# Altium PCB PCB1.PcbDoc
Units mm, origin at the board's own origin, x right, y up, seen from the top; angles counter-clockwise.
Board outline 105 x 145 mm, 2 copper layers (Top Layer, Bottom Layer); 159 components, 110 nets, 512 pads, 120 vias.
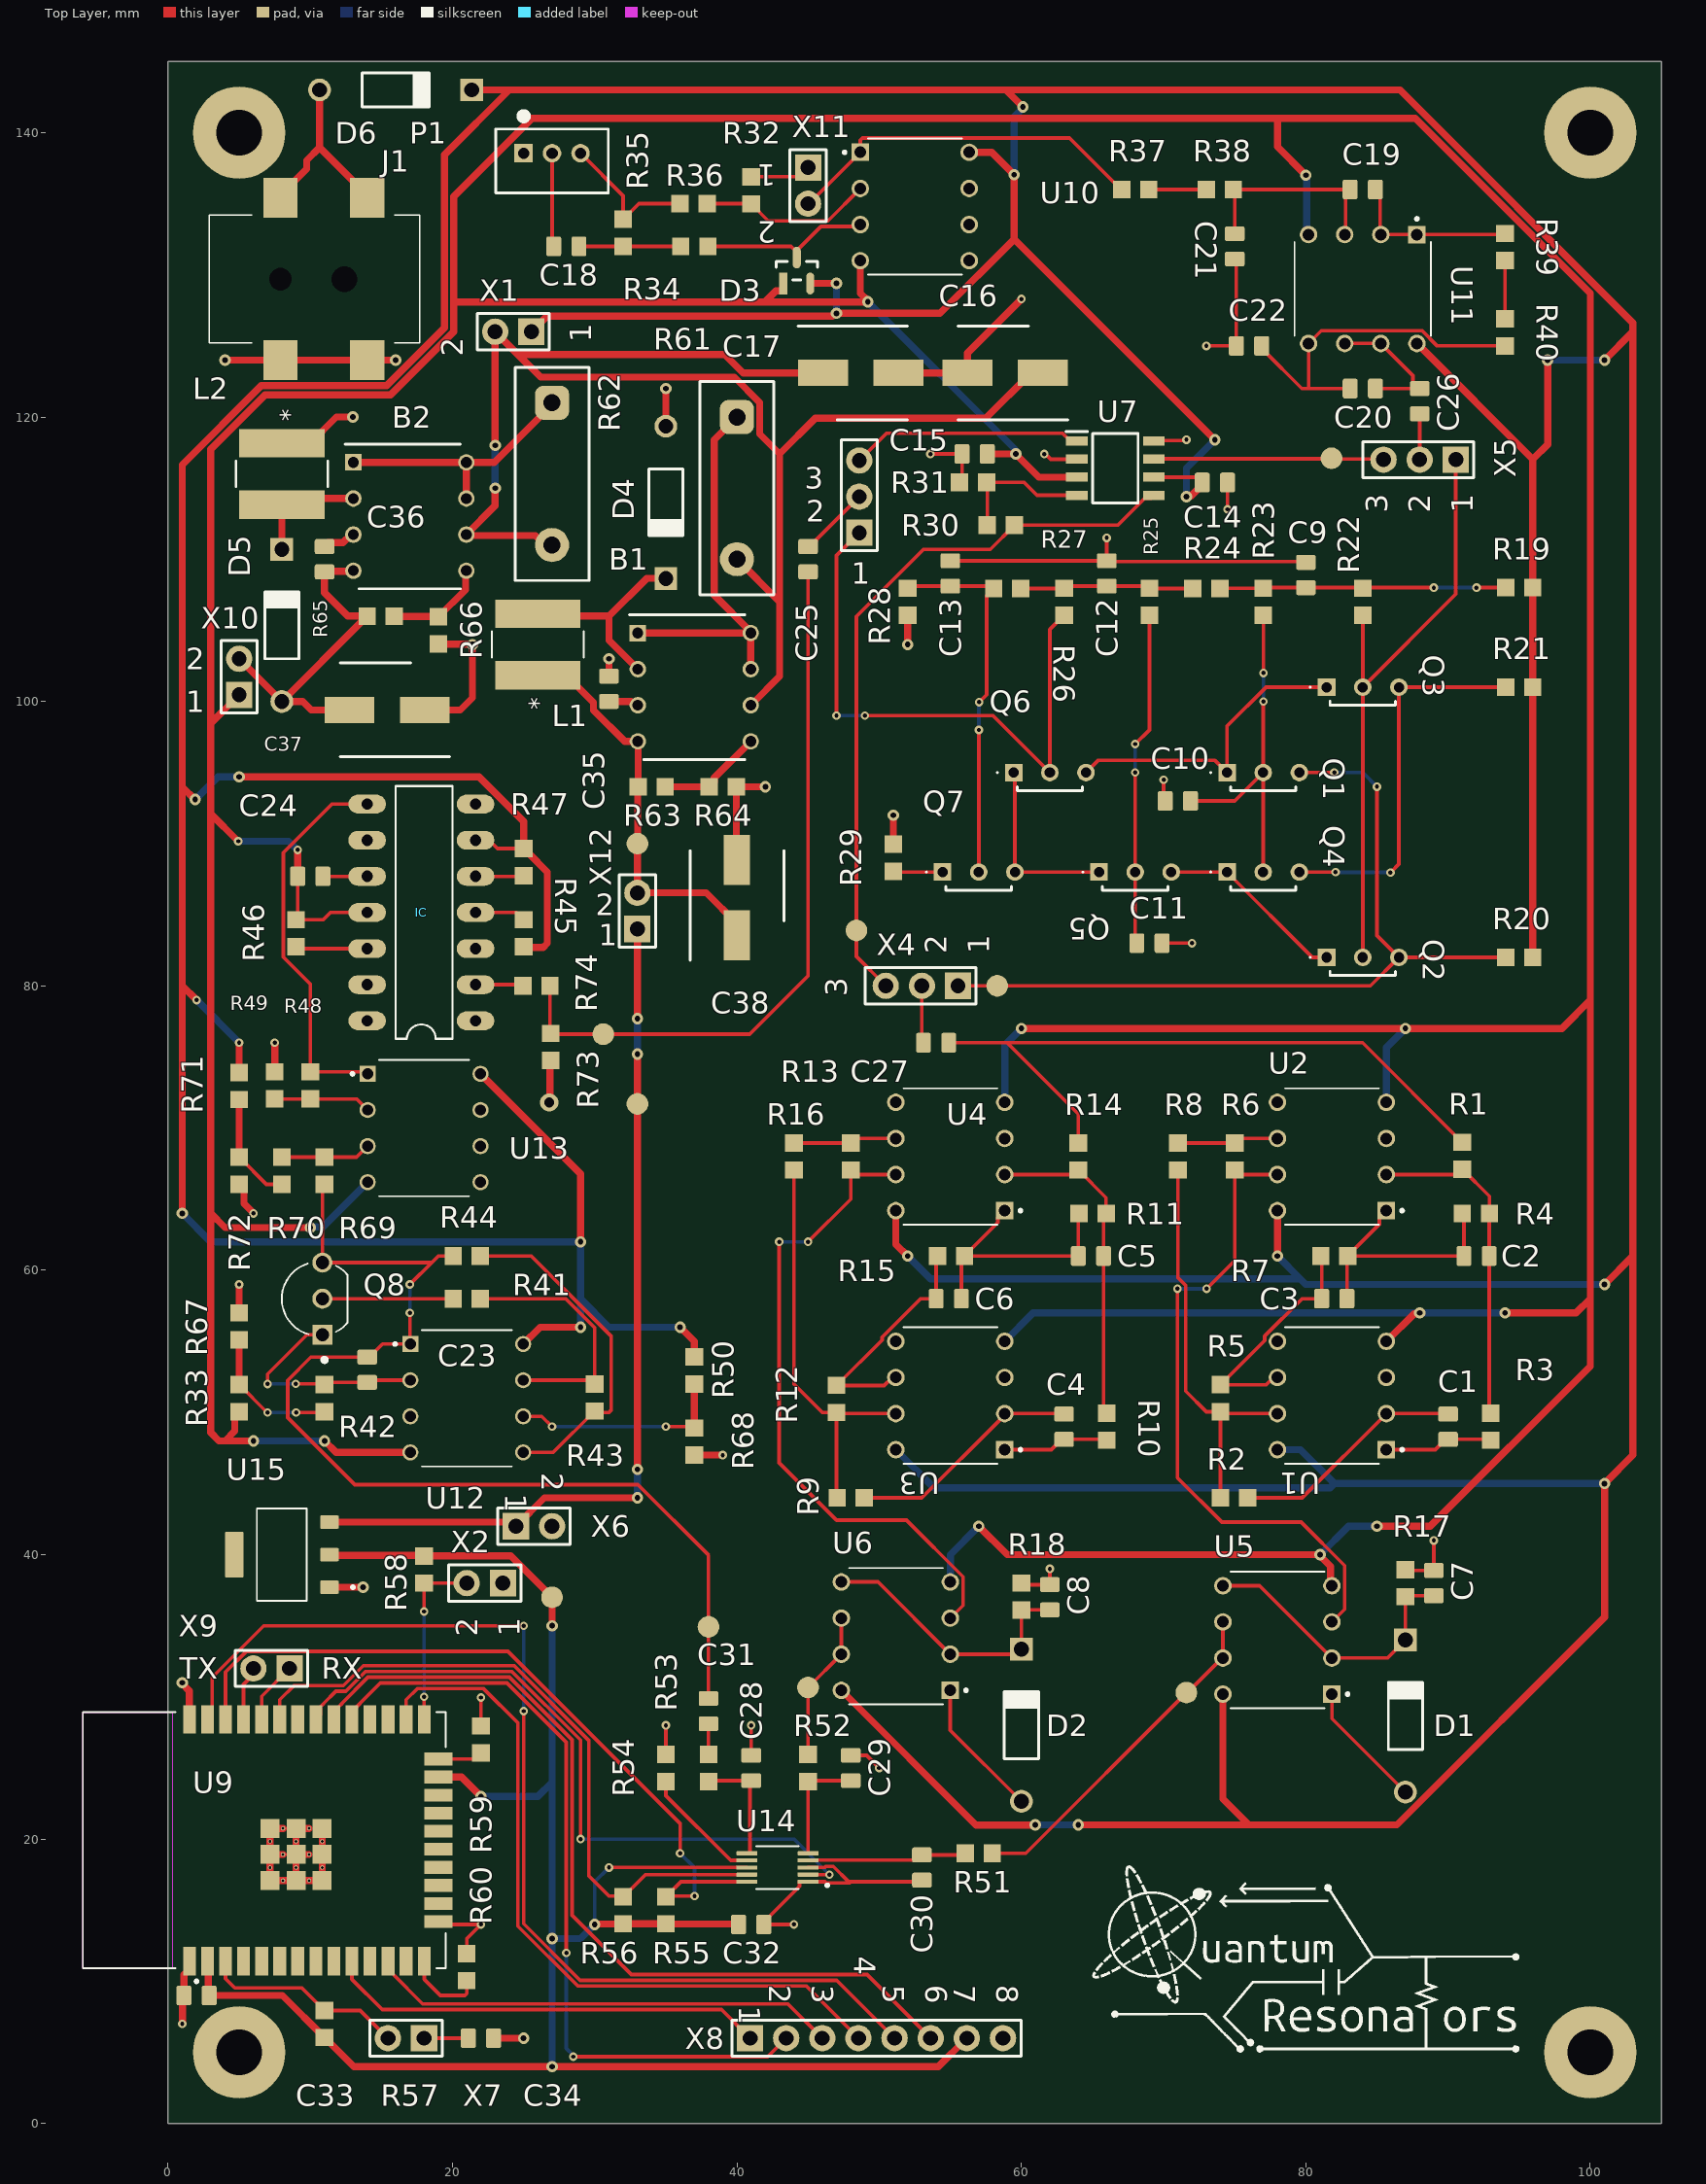
[diagram p0: Top Layer view]
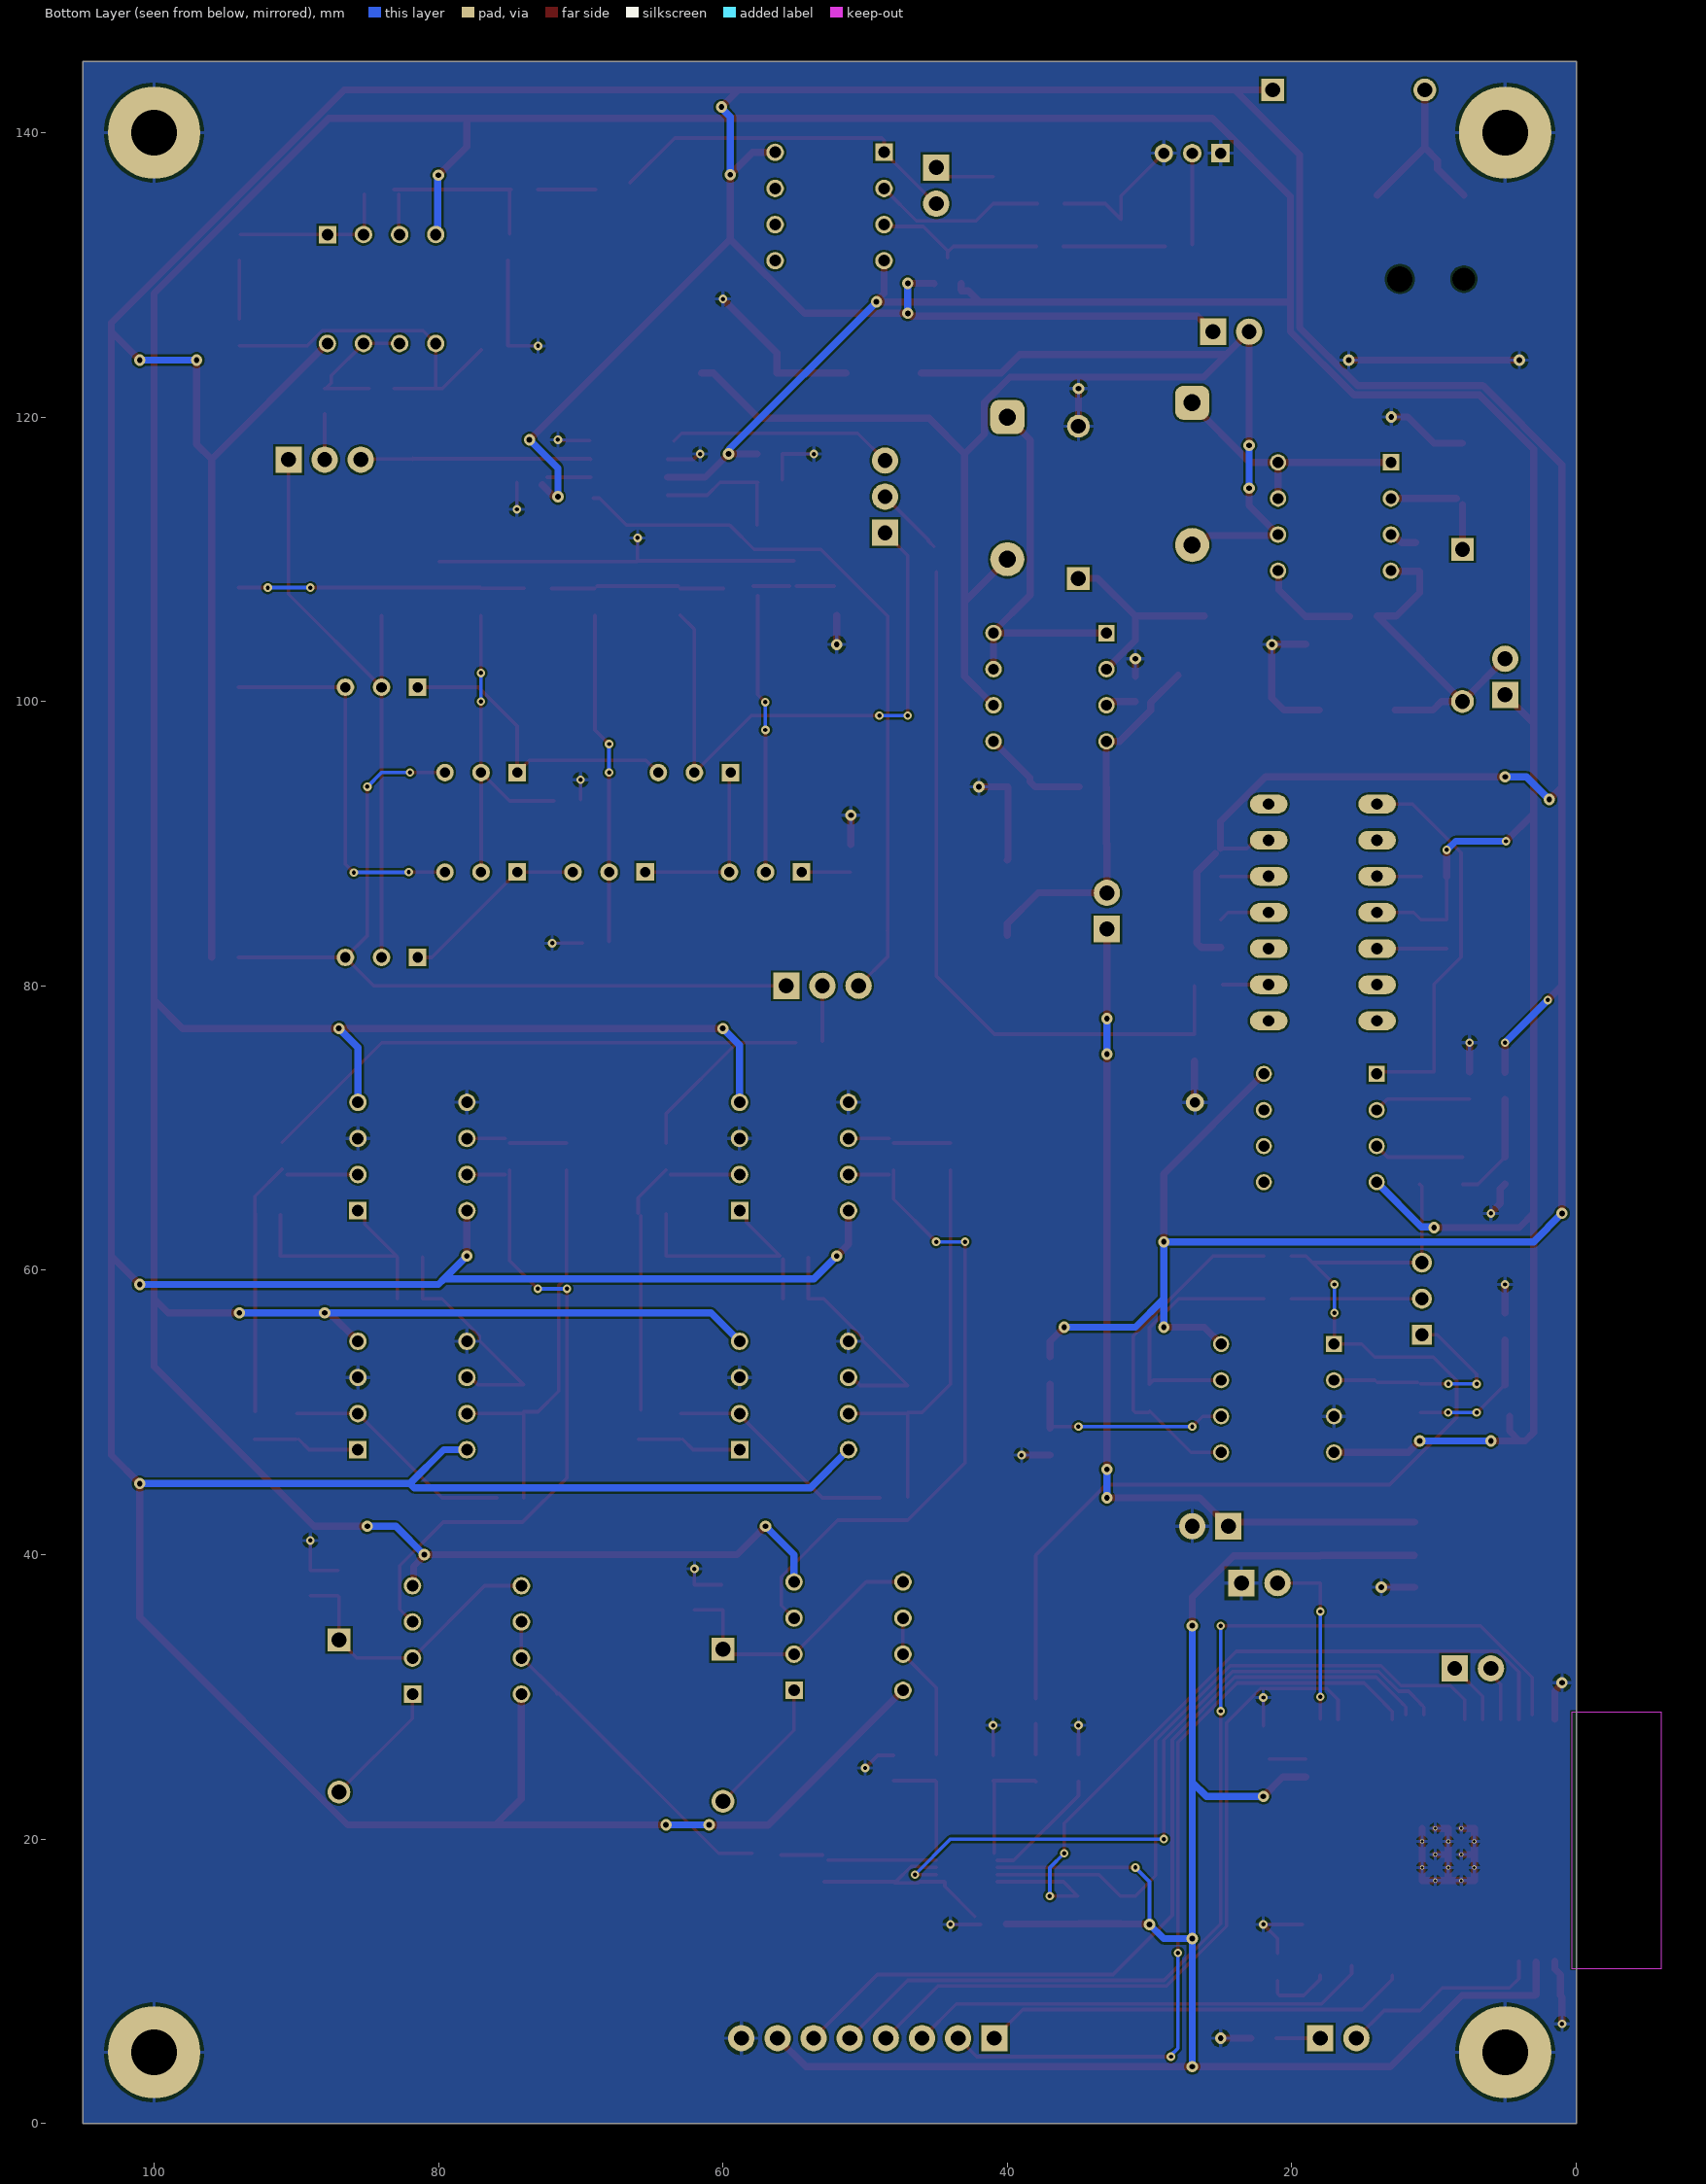
[diagram p1: Bottom Layer view, seen from below]
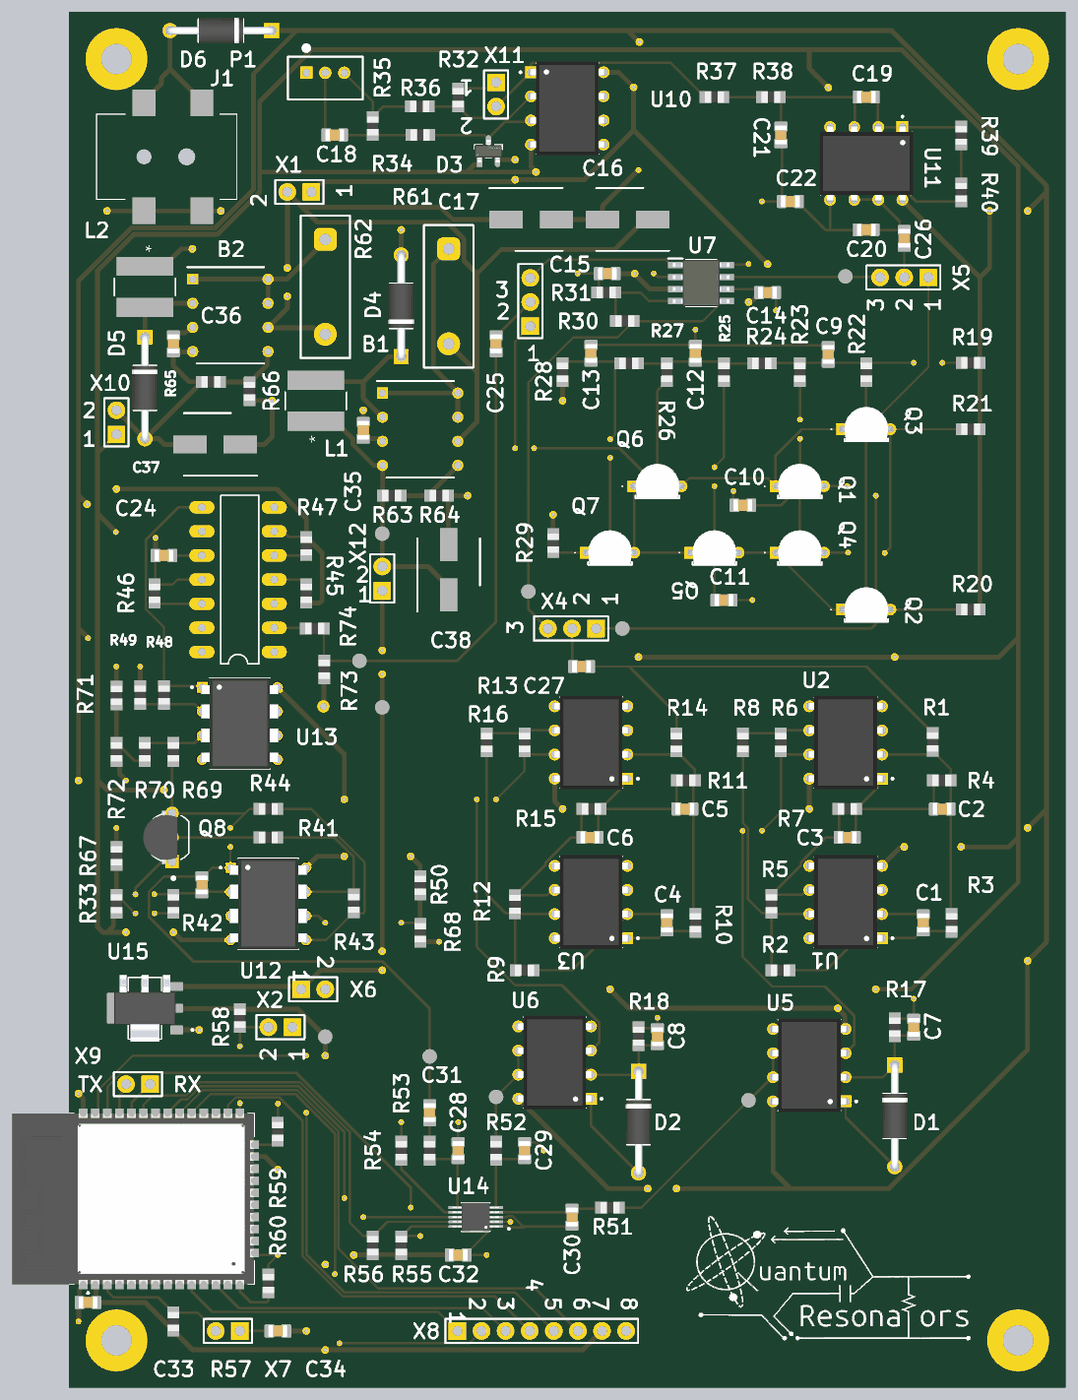
[diagram p2: 3D render of the assembled board from above, using the file's embedded part models]

## Layer stack, top to bottom
Top Solder: solder mask 0.0102, Solder Resist, Dk 3.5
Top Layer: signal copper 0.0356
Dielectric 1: dielectric 0.32, FR-4, Dk 4.8
Bottom Layer: signal copper 0.0356
Bottom Solder: solder mask 0.0102, Solder Resist, Dk 3.5

## Board outline
0,0 0,145 105,145 105,0

## Design rules (kind name [scope] priority, off if disabled: settings)
Clearance [All] p1: gap=0.15 ignorepadtopadclearanceinfootprint=FALSE
HoleSize [All] p1: absolutevalues=TRUE maxlimit=4 minlimit=0.025 maxpercent=80.000 minpercent=20.000
MinimumSolderMaskSliver [All] p1: minsoldermaskwidth=0.1
PolygonConnect [All] p1: connectstyle=Relief reliefconductorwidth=0.254 reliefentries=4 polygonreliefangle="90 Angle" airgapwidth=0.254
RoutingVias [All] p1: holewidth=0.711 width=1.27 viastyle="Through Hole" minholewidth=0.3 minwidth=0.6 maxholewidth=0.711 maxwidth=1.27
SilkToSolderMaskClearance [IsPad] p1: minsilkscreentomaskgap=0.15 clearancetoexposedcopper=TRUE
SolderMaskExpansion [All] p1: expansion=0 istentingtop=FALSE
SupplyNets "Schematic Supply Nets" [InNet('GND')] p1: voltage=0.000
UnRoutedNet [All] p1: checkbadconnections=TRUE
Width [All] p1: maxlimit=0.5 minlimit=0.006 preferedwidth=0.254
26 further rules are at their usual default settings.

## Components (designator, comment, footprint, x,y, rotation, side; value= is the part's Value field where it differs from the comment)
B1 "MC34063AP1G" DIP794W56P254L959H533Q8N 37,101 r0 top
B2 "MC34063AP1G" DIP794W56P254L959H533Q8N 17,113 r0 top
C1 "100nF" CAPC2012X95N 90,49 r90 top
C2 "100nF" CAPC2012X95N 92,61 r180 top
C3 "100nF" CAPC2012X95N 82,58 r180 top
C4 "100nF" CAPC2012X95N 63,49 r90 top
C5 "100nF" CAPC2012X95N 64.888,61 r180 top
C6 "100nF" CAPC2012X95N 54.888,58 r180 top
C7 "100nF" CAPC2012X95N 89,38 r90 top
C8 "100nF" CAPC2012X95N 62,37 r90 top
C9 "100nF" CAPC2012X95N 80,108.888 r90 top
C10 "100nF" CAPC2012X95N 71,93 r0 top
C11 "100nF" CAPC2012X95N 69,83 r180 top
C12 "100nF" CAPC2012X95N 66,109 r90 top
C13 "100nF" CAPC2012X95N 55,109 r90 top
C14 "100nF" CAPC2012X95N 73.6,115.4 r180 top
C15 "100nF" CAPC2012X95N 56.712,117.4 r0 top
C16 "220uF" CAPAE660X800N 58.85,123.1 r180 top
C17 "220uF" CAPAE660X800N 48.7,123.1 r0 top
C18 "1nF" CAPC2012X95N 28,132 r180 top
C19 "1.2nF" CAPC2012X95N 84,136 r0 top
C20 "6.8nF" CAPC2012X95N 84,122 r0 top
C21 "1nF" CAPC2012X95N 75,132 r90 top
C22 "1nF" CAPC2012X95N 76,125 r0 top
C23 "100nF" CAPC2012X95N 14,53 r90 top
C24 "4.7nF" CAPC2012X95N 10,87.7 r180 top
C25 "100nF" CAPC2012X95N 45,110 r270 top
C26 "100nF" CAPC2012X95N 88,121.112 r90 top
C27 "100nF" CAPC2012X95N 54,76 r0 top
C28 "100pF" CAPC2012X95N 41,25 r90 top value=1nF
C29 "100pF" CAPC2012X95N 48,25 r90 top value=1nF
C30 "100pF" CAPC2012X95N 53,18 r270 top value=1nF
C31 "100nF" CAPC2012X95N 38,29 r270 top value=1nF
C32 "100nF" CAPC2012X95N 41,14 r180 top value=1nF
C33 "10nF" CAPC2012X95N 2,9 r180 top locked value=100nF
C34 "1uF" CAPC2012X95N 22,6 r0 top value=100nF
C35 "820pF" CAPC2012X95N 31,100.888 r90 top value=100nF
C36 "820pF" CAPC2012X95N 11,110 r270 top value=100nF
C37 "220uF" CAPAE660X800N 15.4,99.4 r180 top
C38 "220uF" CAPAE660X800N 40,86.2 r90 top
D1 "IN4007" DIOAD1070W78L470D235P 87,28.65 r270 top
D2 "IN4007" DIOAD1070W78L470D235P 60,28 r270 top
D3 "BAV99LT1G" FP-318-08-IPC_B 44.2,130.3 r90 top
D4 "1N5819" DIOAD1070W78L470D235P 35,114 r90 top
D5 "1N5819" DIOAD1070W78L470D235P 8,105.35 r270 top
D6 "IN4007" DIOAD1070W78L470D235P 16,143 r180 top
IC "ICL8038" ICL8038 17.81,85.16 r90 top
J1 "DC-005-5A-2.5-SMT" DC0055A25SMT 10.3,129.7 r0 top
L1 "22uH" IND_BOURNS_SRN6045 26,104 r90 top value=10uH
L2 "88uH" IND_BOURNS_SRN6045 8,116 r270 top value=10uH
P1 "B3B-PH-K-S(LF)(SN)" JST-B3B-PH-K-S-3_V 27,138 r0 top
Q1 "2N2222A" 2N2222A 74.46,95 r0 top
Q2 "2N2222A" 2N2222A 81.46,82 r0 top
Q3 "2N2222A" 2N2222A 81.46,101 r0 top
Q4 "2N2222A" 2N2222A 74.46,88 r0 top
Q5 "2N2222A" 2N2222A 65.46,88 r0 top
Q6 "2N2222A" 2N2222A 59.46,95 r0 top
Q7 "2N2222A" 2N2222A 54.46,88 r0 top
Q8 "2N3904TF" TO92254P520H877-3 10,58 r90 top
R1 "10k" RC0805N_YAG-M 91,68.048 r90 top
R2 "10k" RC0805N_YAG-M 74.953,44 r0 top
R3 "10k" RC0805N_YAG-M 93,49 r90 top
R4 "10k" RC0805N_YAG-M 91.953,64 r0 top
R5 "10k" RC0805N_YAG-M 74,51 r90 top
R6 "10k" RC0805N_YAG-M 75,68 r90 top
R7 "10k" RC0805N_YAG-M 82,61 r0 top
R8 "10k" RC0805N_YAG-M 71,68 r270 top
R9 "10k" RC0805N_YAG-M 48,44 r0 top
R10 "10k" RC0805N_YAG-M 66,49 r90 top
R11 "10k" RC0805N_YAG-M 65,64 r0 top
R12 "10k" RC0805N_YAG-M 47,50.953 r90 top
R13 "10k" RC0805N_YAG-M 48,68 r90 top
R14 "10k" RC0805N_YAG-M 64,68 r90 top
R15 "10k" RC0805N_YAG-M 55.048,61 r0 top
R16 "10k" RC0805N_YAG-M 44,68 r270 top
R17 "10k" RC0805N_YAG-M 87,38 r270 top
R18 "10k" RC0805N_YAG-M 60,37.048 r270 top
R19 "10k" RC0805N_YAG-M 95,108 r0 top
R20 "10k" RC0805N_YAG-M 95,82 r0 top
R21 "10k" RC0805N_YAG-M 95,101 r0 top
R22 "10k" RC0805N_YAG-M 84,107 r270 top
R23 "10k" RC0805N_YAG-M 77,107 r270 top
R24 "10k" RC0805N_YAG-M 73,107.94 r0 top
R25 "10k" RC0805N_YAG-M 69,107 r270 top
R26 "10k" RC0805N_YAG-M 63,107 r270 top
R27 "10k" RC0805N_YAG-M 59,107.94 r0 top
R28 "10k" RC0805N_YAG-M 52,107 r90 top
R29 "10k" RC0805N_YAG-M 51,89 r270 top
R30 "10k" RC0805N_YAG-M 58.553,112.4 r180 top
R31 "10k" RC0805N_YAG-M 56.6,115.4 r180 top
R32 "25k" RC0805N_YAG-M 41,135.94 r270 top
R33 "62k" RC0805N_YAG-M 5,51 r90 top value=10k
R34 "47.5k" RC0805N_YAG-M 37,132 r180 top
R35 "10M" RC0805N_YAG-M 32,132.953 r90 top
R36 "909" RC0805N_YAG-M 36.953,135 r180 top
R37 "29.4k" RC0805N_YAG-M 68,136 r180 top
R38 "29.4k" RC0805N_YAG-M 73.953,136 r180 top
R39 "12.4k" RC0805N_YAG-M 94,131.953 r90 top
R40 "12.4k" RC0805N_YAG-M 94,125.953 r90 top
R41 "10k" RC0805N_YAG-M 21,58 r180 top
R42 "470k" RC0805N_YAG-M 11,51 r270 top
R43 "60k" RC0805N_YAG-M 30,51.048 r270 top
R44 "10k" RC0805N_YAG-M 21,61 r0 top
R45 "10k" RC0805N_YAG-M 25,83.7 r270 top
R46 "82k" RC0805N_YAG-M 9,83.7 r270 top
R47 "10k" RC0805N_YAG-M 25,88.7 r90 top
R48 "22.5k" RC0805N_YAG-M 10,73 r270 top
R49 "10k" RC0805N_YAG-M 7.5,73 r90 top
R50 "62k" RC0805N_YAG-M 37,52.953 r270 top value=10k
R51 "10k" RC0805N_YAG-M 57,19 r0 top
R52 "10k" RC0805N_YAG-M 45,25 r90 top
R53 "10k" RC0805N_YAG-M 38,25 r90 top
R54 "10k" RC0805N_YAG-M 35,25 r90 top
R55 "10k" RC0805N_YAG-M 35,15 r270 top
R56 "10k" RC0805N_YAG-M 32,15 r270 top
R57 "10k" RC0805N_YAG-M 11,7 r90 top
R58 "10k" RC0805N_YAG-M 18,38.953 r270 top
R59 "10k" RC0805N_YAG-M 22,27 r270 top
R60 "10k" RC0805N_YAG-M 21,11 r270 top
R61 "0.33" RES_BPR56_5W_10MM_VERTICAL. 40,115 r270 top value=10k
R62 "0.22" RES_BPR56_5W_10MM_VERTICAL. 27,116 r270 top value=10k
R63 "3.6k" RC0805N_YAG-M 34,94 r180 top value=12.4k
R64 "1.2k" RC0805N_YAG-M 39,94 r180 top value=12.4k
R65 "1k" RC0805N_YAG-M 14.952,106 r180 top value=12.4k
R66 "6.8k" RC0805N_YAG-M 19,105 r90 top value=12.4k
R67 "18k" RC0805N_YAG-M 5,56.048 r90 top value=10k
R68 "18k" RC0805N_YAG-M 37,47.952 r270 top value=10k
R69 "100k" RC0805N_YAG-M 11,67 r270 top
R70 "25k" RC0805N_YAG-M 8,67 r270 top value=10k
R71 "62k" RC0805N_YAG-M 5,72.953 r270 top value=10k
R72 "18k" RC0805N_YAG-M 5,67 r270 top value=10k
R73 "10k" RC0805N_YAG-M 26.9,75.7 r90 top
R74 "10k" RC0805N_YAG-M 25.9,80 r180 top
U1 "NE5532N" DIP766W45P254L1016H533Q8 81.83,51.19 r180 top
U2 "NE5532N" DIP766W45P254L1016H533Q8 81.83,68 r180 top
U3 "NE5532N" DIP766W45P254L1016H533Q8 55,51.19 r180 top
U4 "NE5532N" DIP766W45P254L1016H533Q8 55,68 r180 top
U5 "NE5532N" DIP766W45P254L1016H533Q8 78,34 r180 top
U6 "NE5532N" DIP766W45P254L1016H533Q8 51.17,34.27 r180 top
U7 "AD633JRZ-R7" SOIC127P600X175-8N 66.6,116.4 r0 top
U9 "ESP32-WROOM-32D-N4" MODULE_ESP32-WROOM-32D-N4 6.76,19.918 r90 top
U10 "NE5532N" DIP766W45P254L1016H533Q8 52.5,134.8 r0 top
U11 "NE5532N" DIP766W45P254L1016H533Q8 84,129 r270 top
U12 "TL072CPE4" DIP794W45P254L959H508Q8 21,51 r0 top
U13 "TL072CPE4" DIP794W45P254L959H508Q8 18,70 r0 top
U14 "ADS1115IDGSR" SOP50P490X110-10N 42.85,18 r180 top
U15 "AMS1117-3.3" SOT229P700X180-4N 8,40 r180 top
X1 "Jumper" CON_JUMPER_2POL 25.54,126 r90 top value=10k
X2 "Jumper" CON_JUMPER_2POL 23.54,38 r90 top value=10k
X3 "Jumper" CON_JUMPER_3POL 48.6,111.86 r0 top value=10k
X4 "Jumper" CON_JUMPER_3POL 55.54,80 r90 top value=10k
X5 "Jumper" CON_JUMPER_3POL 90.54,117 r90 top value=10k
X6 "Jumper" CON_JUMPER_2POL 24.46,42 r270 top value=10k
X7 "Jumper" CON_JUMPER_2POL 18,6 r90 top value=10k
X8 "Jumper" CON_JUMPER_8POL_LINEAR 40.92,6 r270 top value=10k
X9 "Jumper" CON_JUMPER_2POL 8.54,32 r90 top value=10k
X10 "Jumper" CON_JUMPER_2POL 5,100.46 r0 top value=10k
X11 "Jumper" CON_JUMPER_2POL 45,137.54 r180 top value=10k
X12 "Jumper" CON_JUMPER_2POL 33,84 r0 top value=10k

## Footprints (in the part's own frame and the unit in brackets; to place one, negate y for a bottom-side part, rotate by r counter-clockwise, add the part's x,y. Pads: shape width x height; smd on the part's side, far side on the other; paste and mask are expansions set on the pad)
2N2222A [mm]
  rect 1.234x1.234 hole 0.72: 1(0,0)
  round 1.234 hole 0.72: 2(2.54,0) 3(5.08,0)
  silkscreen extent -1.2,-1.27 4.84,0.05, body extent -0.2,-1.25 5.28,2.35, height 7.46
CAPAE660X800N [mm]
  rect 3.5x1.85 smd: 1(-2.65,0) 2(2.65,0)
  silkscreen extent -4.4,-3.3 3.3,3.3
CAPC2012X95N [mm]
  rrect25% 1.05x1.38 smd: 1(-0.888,0) 2(0.888,0)
  body extent -1,-0.63 1,0.63, height 0.95
CON_JUMPER_2POL [mm] "Jumper"
  rect 1.85x1.85 hole 1.05: 1(0,0)
  round 1.85 hole 1.05: 2(0,2.54)
  silkscreen extent -1.27,-1.27 1.27,3.81
CON_JUMPER_3POL [mm] "Jumper"
  rect 1.85x1.85 hole 1.05: 1(0,0)
  round 1.85 hole 1.05: 2(0,2.54) 3(0,5.08)
  silkscreen extent -1.27,-1.27 1.27,6.54
CON_JUMPER_8POL_LINEAR [mm] "Jumper"
  rect 1.85x1.85 hole 1.05: 1(0,0)
  round 1.85 hole 1.05: 2(0,2.54) 3(0,5.08) 4(0,7.62) 5(0,10.16) 6(0,12.7) 7(0,15.24) 8(0,17.78)
  silkscreen extent -1.27,-1.27 1.27,19.05
DC0055A25SMT [mm]
  rect 2.4x2.8 smd: 2(-2.4,-5.7) 3(3.7,-5.7) A1(-2.4,5.7) B1(3.7,5.7)
  round 0.8 hole 1.6 unplated: 5(-2.4,0)
  round 0.9 hole 1.8 unplated: 6(2.1,0)
  silkscreen extent -7.4,-4.5 7.4,4.5
DIOAD1070W78L470D235P [mm]
  round 1.6 hole 1.05: A(5.35,0)
  rect 1.6x1.6 / inner round 1.6 / far side rect 1.6x1.6 hole 1.05: C(-5.35,0)
  silkscreen extent -2.4,-1.2 2.35,1.2, body extent -5.74,-1.35 5.74,1.35, height 2.7
DIP766W45P254L1016H533Q8 [mm]
  rect 1.23x1.23 / inner round 1.23 / far side rect 1.23x1.23 hole 0.82: 1(-3.83,3.81)
  round 1.23 hole 0.82: 2(-3.83,1.27) 3(-3.83,-1.27) 4(-3.83,-3.81) 5(3.83,-3.81) 6(3.83,-1.27) 7(3.83,1.27) 8(3.83,3.81)
  silkscreen extent -5.03,-4.79 3.3,4.79, body extent -4,-4.94 4,4.94, height 5.33
DIP794W45P254L959H508Q8 [mm]
  rect 1.13x1.13 / inner round 1.13 / far side rect 1.13x1.13 hole 0.78 mask+0.102: 1(-3.97,3.81)
  round 1.13 hole 0.78 mask+0.102: 2(-3.97,1.27) 3(-3.97,-1.27) 4(-3.97,-3.81) 5(3.97,-3.81) 6(3.97,-1.27) 7(3.97,1.27) 8(3.97,3.81)
  silkscreen extent -5.13,-4.79 3.17,4.79, body extent -4.1,-4.79 4.1,4.79, height 5.08
DIP794W56P254L959H533Q8N [mm]
  rect 1.16x1.16 / inner round 1.16 / far side rect 1.16x1.16 hole 0.76: 1(-3.97,3.81)
  round 1.16 hole 0.76: 2(-3.97,1.27) 3(-3.97,-1.27) 4(-3.97,-3.81) 5(3.97,-3.81) 6(3.97,-1.27) 7(3.97,1.27) 8(3.97,3.81)
  silkscreen extent -4.55,-5.08 3.55,5.08
FP-318-08-IPC_B [mm]
  rect 1.524x0.578 smd paste+0 mask+0: 1(-0.91,0.95)
  rrect100% 1.524x0.578 smd paste+0 mask+0: 2(-0.91,-0.95) 3(0.91,0)
  silkscreen extent -0.65,-1.45 0.65,1.45, body extent -1.92,-1.7 1.92,1.7, height 0.25
ICL8038 [mil]
  oval 52x104 hole 32: 1(-300,-150) 2(-200,-150) 3(-100,-150) 4(0,-150) 5(100,-150) 6(200,-150) 7(300,-150) 8(300,150) 9(200,150) 10(100,150) 11(0,150) 12(-100,150) 13(-200,150) 14(-300,150)
  silkscreen extent -350,-86 350,71
IND_BOURNS_SRN6045 [mil]
  rect 79x236 smd paste+0 mask+0: 1(-85,0) 2(85,0)
  silkscreen extent -36,-127 36,127
JST-B3B-PH-K-S-3_V [mm] "Connector, 3-Leads, Body 7.9x4.5mm, Pitch 2mm"
  rect 1.3x1.3 hole 0.8: 1(-2,0.55)
  round 1.3 hole 0.8: 2(0,0.55) 3(2,0.55)
  silkscreen extent -3.95,-2.25 3.95,3.4, body extent -3.95,-2.25 3.95,2.25, height 6
MODULE_ESP32-WROOM-32D-N4 [mm]
  rect 2x0.9 smd: 1(-8.5,5.26) 2(-8.5,3.99) 3(-8.5,2.72) 4(-8.5,1.45) 5(-8.5,0.18) 6(-8.5,-1.09) 7(-8.5,-2.36) 8(-8.5,-3.63) 9(-8.5,-4.9) 10(-8.5,-6.17) 11(-8.5,-7.44) 12(-8.5,-8.71) 13(-8.5,-9.98) 14(-8.5,-11.25) 25(8.5,-11.25) 26(8.5,-9.98) 27(8.5,-8.71) 28(8.5,-7.44) 29(8.5,-6.17) 30(8.5,-4.9) 31(8.5,-3.63) 32(8.5,-2.36) 33(8.5,-1.09) 34(8.5,0.18) 35(8.5,1.45) 36(8.5,2.72) 37(8.5,3.99) 38(8.5,5.26)
  rect 0.9x2 smd: 15(-5.715,-12.25) 16(-4.445,-12.25) 17(-3.175,-12.25) 18(-1.905,-12.25) 19(-0.635,-12.25) 20(0.635,-12.25) 21(1.905,-12.25) 22(3.175,-12.25) 23(4.445,-12.25) 24(5.715,-12.25)
  rect 1.33x1.33 smd: 39_1(-2.835,-0.405) 39_2(-1,-0.405) 39_3(0.835,-0.405) 39_4(-2.835,-2.24) 39_5(-1,-2.24) 39_6(0.835,-2.24) 39_7(-2.835,-4.075) 39_8(-1,-4.075) 39_9(0.835,-4.075)
  round 0.3 hole 0.2: 39_10(-1.917,-0.405) 39_11(-0.082,-0.405) 39_12(-2.835,-1.323) 39_13(-1,-1.323) 39_14(0.835,-1.323) 39_15(-1.917,-2.24) 39_16(-0.082,-2.24) 39_17(-2.835,-3.158) 39_18(-1,-3.158) 39_19(0.835,-3.158) 39_20(-1.917,-4.075) 39_21(-0.082,-4.075)
  Keep-Out Layer region: 9,6.45 -9,6.45 -9,12.75 9,12.75
  silkscreen extent -10.02,-12.75 9,12.75, body extent -9,-12.75 9,12.75, height 3.25
RC0805N_YAG-M [mil]
  rect 48x49 smd paste+0 mask+0: 1(-37.5,0) 2(37.5,0)
  body extent -39,-24 39,24, height 28
RES_BPR56_5W_10MM_VERTICAL. [mm]
  rrect50% 2.4x2.4 hole 1.2: 1(-5,0)
  round 2.4 hole 1.2: 2(5,0)
  silkscreen extent -7.5,-2.6 7.5,2.6, body extent -7.5,-2.6 7.5,2.6, height 18
SOIC127P600X175-8N [mm]
  rect 1.525x0.65 smd: 1(-2.712,1.905) 2(-2.712,0.635) 3(-2.712,-0.635) 4(-2.712,-1.905) 5(2.712,-1.905) 6(2.712,-0.635) 7(2.712,0.635) 8(2.712,1.905)
  silkscreen extent -3.47,-2.45 1.6,2.58, body extent -3,-2.45 3,2.45, height 1.75
SOP50P490X110-10N [mm]
  rrect25% 1.47x0.28 smd: 1(-2.15,1) 2(-2.15,0.5) 3(-2.15,0) 4(-2.15,-0.5) 5(-2.15,-1) 6(2.15,-1) 7(2.15,-0.5) 8(2.15,0) 9(2.15,0.5) 10(2.15,1)
  silkscreen extent -3.6,-1.5 1.5,1.5, body extent -2.45,-1.5 2.45,1.5, height 1.1
SOT229P700X180-4N [mm]
  rrect15% 1.31x0.93 smd: 1(-3.345,2.29) 2(-3.345,0) 3(-3.345,-2.29)
  rrect15% 1.31x3.24 smd: 4(3.345,0)
  silkscreen extent -5.1,-3.25 1.75,3.25, body extent -3.25,-3.5 3.25,3.5, height 1.8
TO92254P520H877-3 [mm]
  rect 1.41x1.41 / inner round 1.41 / far side rect 1.41x1.41 hole 0.94: 1(-2.54,-0.853)
  round 1.41 hole 0.94: 2(0,-0.853) 3(2.54,-0.853)
  silkscreen extent -4.44,-2.62 2.47,2.01, body extent -2.83,-1.43 2.83,2.19, height 8.77

## Part data
B1 B2: "Low Standby Current; Output Voltage Adjustable; Precision 2% Reference; Operation from 3.0 V to 40 V Input; Current Limiting; Frequency Operation to 100 kHz; Output Switch Current to 1.5 A; MC34063A = 0 to +70; MC33063A = -40 to +85; MC33063AV / NCV33063A = -40 to +125; 4x4mm DFN package option", Manufacturer_Name=onsemi, Mouser Part Number=863-MC34063AP1G, Arrow Part Number=MC34063AP1G, Arrow Price/Stock=https://www.arrow.com/en/products/mc34063ap1g/on-semiconductor?utm_currency=USD&region=europe, Datasheet Link=https://www.onsemi.com/pub/Collateral/MC34063A-D.PDF, Geometry.Height=5.33mm, Manufacturer_Part_Number=MC34063AP1G, Mouser Price/Stock=https://www.mouser.co.uk/ProductDetail/onsemi/MC34063AP1G?qs=dFKnUM%2FquJaLwjzEV8VjCA%3D%3D
C1 C2 C3 C4 C5 C6 C7 C8 C9 C10 C11 C12 C13 C14 C15 C18 C19 C20 C21 C22 C23 C24 C25 C26 C27 C28 C29 C30 C31 C32 C33 C34 C35 C36: library part CAP_0805_GENERIC, "0.1 ÂµF Â±10% 50V Ceramic Capacitor X7R 0805 (2012 Metric)", Package="SMD-2 Samsung", Voltage=50V, Check_prices=https://www.snapeda.com/parts/CL21B104KBCNNNC/Samsung/view-part/?ref=eda, MF="Samsung Electro-Mechanics", MP=CL21B104KBCNNNC, SnapEDA_Link=https://www.snapeda.com/parts/CL21B104KBCNNNC/Samsung/view-part/?ref=snap
C16 C17 C37 C38: library part UUD1C221MCL1GS, "Nichicon 220uF 16 V Aluminium Electrolytic Capacitor, UD Series 2000h 6.3 Dia. x 7.7mm", Manufacturer_Name=Nichicon, Mouser Part Number=647-UUD1C221MCL, Arrow Part Number=UUD1C221MCL1GS, Arrow Price/Stock=https://www.arrow.com/en/products/uud1c221mcl1gs/nichicon?utm_currency=USD&region=nac, Datasheet Link=http://www.mouser.com/datasheet/2/293/e-uud-1513238.pdf, Geometry.Height=8mm, Manufacturer_Part_Number=UUD1C221MCL1GS, Mouser Price/Stock=https://www.mouser.co.uk/ProductDetail/Nichicon/UUD1C221MCL1GS?qs=BJlw7L4Cy78LNN5S2Zav%252BA%3D%3D
D1 D2 D6: "Diode Standard 1000 V 1A Through Hole DO-204AL (DO-41)", Package="DO-41 Vishay Semiconductor", Check_prices=https://www.snapeda.com/parts/IN4007/Vishay/view-part/?ref=eda, MF="Vishay Semiconductor", MP=IN4007, SnapEDA_Link=https://www.snapeda.com/parts/IN4007/Vishay/view-part/?ref=snap
D3: library part CMP-07163-000036-1, "DIODE ARRAY 100V 215MA SOT23-3", Capacitance=1.5pF, Case/Package=SOT-23, Current Rating=200mA, Forward Current=150mA, Forward Voltage=1.25V, Max Forward Surge Current (Ifsm)=500mA, Max Operating Temperature=150°C, Max Repetitive Reverse Voltage (Vrrm)=70V, Min Operating Temperature=-65°C, Peak Non-Repetitive Surge Current=2A, Peak Reverse Current=2.5uA, Height=0.94mm, Lead Free="Lead Free", Length=2.9mm, Mount="Surface Mount", Number of Pins=3, Packaging="Tape and Reel", REACH SVHC="No SVHC", Reverse Recovery Time=6ns, Voltage Rating (DC)=70V, Width=1.3mm
D4 D5: library part IN4007, "Diode Standard 1000 V 1A Through Hole DO-204AL (DO-41)", Package="DO-41 Vishay Semiconductor", Check_prices=https://www.snapeda.com/parts/IN4007/Vishay/view-part/?ref=eda, MF="Vishay Semiconductor", MP=IN4007, SnapEDA_Link=https://www.snapeda.com/parts/IN4007/Vishay/view-part/?ref=snap
IC: "IC OSCILL GEN/VOLT CONTROL 14DIP", Package=None, Availability=Unavailable, MF="Renesas Electronics", MP=ICL8038, Price=None, SnapEDA_Link=https://www.snapeda.com/parts/ICL8038/Renesas%20Electronics%20America%20Inc./view-part/1764984/?ref=snap
J1: "DC Power Jack", Manufacturer_Name="XKB Connectivity", Datasheet Link=https://datasheet.lcsc.com/szlcsc/XKB-DC-005-5A-2-5-SMT_C319133.pdf, Geometry.Height=11mm, Manufacturer_Part_Number=DC-005-5A-2.5-SMT
L1 L2: library part IND_SRN6045_GENERIC, "Description", Current=3A, Manufacturer_Name="Bourns Electronics", Manufacturer_Part_Number=SRN6045-100M, Copyright="Copyright (C) 2026 Ultra Librarian. All rights reserved."
P1: library part CMP-2000-05164-1, "Male Header, Pitch 2 mm, 1 x 3 Position, Height 6 mm, Tail Length 3.4 mm, -25 to 85 degC, RoHS, Bulk", Manufacturer=JST, Datasheet URL=https://datasheet.ciiva.com/11746/0900766b80826550-11746939.pdf, Datasheet Version=Oct-06, Manufacturer URL=http://www.jst.com/home2.html, No of Positions=3, Pitch=2mm, Style/Orientation=StraightHeader/Plug, Termination=Crimp, Type=ShroudedHeader
Q1 Q2 Q3 Q4 Q5 Q6 Q7: "Transistor BJT NPN", Manufacturer_Name=Diotec, Mouser Part Number=637-2N2222A, Arrow Part Number=2N2222A, Arrow Price/Stock=https://www.arrow.com/en/products/2n2222a/diotec-semiconductor-ag, Datasheet Link=https://diotec.com/request/datasheet/2n2222a.pdf, Height=7.5mm, Manufacturer_Part_Number=2N2222A, Mouser Price/Stock=https://www.mouser.co.uk/ProductDetail/Diotec-Semiconductor/2N2222A?qs=OlC7AqGiEDmNlRSTGL2dYg%3D%3D
Q8: "Transistor General Purpose BJT NPN 40 Volt 0.2 Amp 3-Pin TO-92 Tape And Reel", Package="TO-92-3 ON Semiconductor", Check_prices=https://www.snapeda.com/parts/2N3904TF/Fairchild+Imaging/view-part/?ref=eda, MF="Fairchild Semiconductor", MP=2N3904TF, SnapEDA_Link=https://www.snapeda.com/parts/2N3904TF/Fairchild+Imaging/view-part/?ref=snap
R1 R2 R3 R4 R5 R6 R7 R8 R9 R10 R11 R12 R13 R14 R15 R16 R17 R18 R19 R20 R21 R22 R23 R24 R25 R26 R27 R28 R29 R30 R31 R32 R33 R34 R35 R36 R37 R38 R39 R40 R41 R42 R43 R44 R45 R46 R47 R48 R49 R50 R51 R52 R53 R54 R55 R56 R57 R58 R59 R60 R63 R64 R65 R66 R67 R68 R69 R70 R71 R72 R73 R74: library part RES_0805_GENERIC_1, "Description", Manufacturer_Name=Yageo, Manufacturer_Part_Number=RC0805FR-0710KL, Copyright="Copyright (C) 2025 Ultra Librarian. All rights reserved."
R61 R62: library part RES_BPR56_5W_10MM_VERTICAL, "Description", Manufacturer_Name=Yageo, Manufacturer_Part_Number=RC0805FR-0710KL, Copyright="Copyright (C) 2025 Ultra Librarian. All rights reserved."
U1 U2 U3 U4 U5 U6 U10 U11: "IC, OP AMP, DUAL; No. of Amplifiers: 2 Amplifier; Bandwidth: 10MHz; Slew Rate: 8V/Âµs; Supply Voltage Range: Â± 15V; Amplifier Case Style: DIP; No. of Pins: 8Pins; Operating Temperature Min: 0Â°C; Operating Temperature Max: 70Â°C; MSL: -; SVHC: No SVHC (1", Package="PDIP-8 ON Semiconductor", Check_prices=https://www.snapeda.com/parts/NE5532N/Fairchild+Imaging/view-part/?ref=eda, MF="Fairchild Semiconductor", MP=NE5532N, SnapEDA_Link=https://www.snapeda.com/parts/NE5532N/Fairchild+Imaging/view-part/?ref=snap
U7: "Analog Multiplier 4-Quadrant 8-SOIC", Package="SOIC-8 Analog Devices", Check_prices=https://www.snapeda.com/parts/AD633AR/Analog+Devices/view-part/?ref=eda, MF="Analog Devices", MP=AD633AR, SnapEDA_Link=https://www.snapeda.com/parts/AD633AR/Analog+Devices/view-part/?ref=snap
U9: "Bluetooth, WiFi 802.11b/g/n, Bluetooth v4.2 +EDR, Class 1, 2 and 3 Transceiver Module 2.4GHz ~ 2.5GHz Integrated, Trace Surface Mount", Package="Non Standard Espressif Systems", Check_prices=https://www.snapeda.com/parts/ESP32-WROOM-32D-N4/Espressif+Systems/view-part/?ref=eda, MF="Espressif Systems", MP=ESP32-WROOM-32D-N4, SnapEDA_Link=https://www.snapeda.com/parts/ESP32-WROOM-32D-N4/Espressif+Systems/view-part/?ref=snap
U12 U13: "Dual Low-Noise JFET-Input General-Purpose Operational Amplifier 8-PDIP 0 to 70", Package="PDIP-8 Texas", Check_prices=https://www.snapeda.com/parts/TL072CPE4/Texas+Instruments/view-part/?ref=eda, MF="Texas Instruments", MP=TL072CPE4, SnapEDA_Link=https://www.snapeda.com/parts/TL072CPE4/Texas+Instruments/view-part/?ref=snap
U14: "16-bit, 860-SPS, 4-channel, delta-sigma ADC with PGA, oscillator, VREF, comparator and I2C", Package="VSSOP-10 Texas Instruments", Check_prices=https://www.snapeda.com/parts/ADS1115IDGSR/Texas+Instruments/view-part/?ref=eda, MF="Texas Instruments", MP=ADS1115IDGSR, SnapEDA_Link=https://www.snapeda.com/parts/ADS1115IDGSR/Texas+Instruments/view-part/?ref=snap
U15: "LDO Voltage Regulators 800MA LDO LINEAR REG", Package="SOT-223 Seeed Technology", Check_prices=https://www.snapeda.com/parts/AMS1117-3.3/ams/view-part/?ref=eda, MF="ams AG", MP=AMS1117-3.3, SnapEDA_Link=https://www.snapeda.com/parts/AMS1117-3.3/ams/view-part/?ref=snap
X1 X2 X6 X7 X9 X10 X11 X12: library part CON_JUMPER_2POL, Manufacturer_Name=Yageo, Manufacturer_Part_Number=RC0805FR-0710KL, Copyright="Copyright (C) 2025 Ultra Librarian. All rights reserved."
X3 X4 X5: library part CON_JUMPER_3POL, Manufacturer_Name=Yageo, Manufacturer_Part_Number=RC0805FR-0710KL, Copyright="Copyright (C) 2025 Ultra Librarian. All rights reserved."
X8: library part CON_JUMPER_8POL_LINEAR, Manufacturer_Name=Yageo, Manufacturer_Part_Number=RC0805FR-0710KL, Copyright="Copyright (C) 2025 Ultra Librarian. All rights reserved."

## Free pads (board coordinates)
  round 6.5 hole 3.2: 2(5,5) 2(100,5) 3(5,140) 3(100,140)
  round 1.524 smd: 4(27,37) 4(30.6,76.6) 4(33,71.7) 4(33,90) 4(38,34.923) 4(45,30.66) 4(48.4,83.9) 4(58.3,80) 4(71.6,30.3) 4(81.8,117.1)

## Via types
v1: diameter 0.6, hole 0.3, Top Layer to Bottom Layer, 63 vias
v2: diameter 0.8, hole 0.4, Top Layer to Bottom Layer, 56 vias
v3: diameter 1.27, hole 0.711, Top Layer to Bottom Layer, 1 vias

## Nets (pads, with @x,y where several pads share a name; then routed paths per layer and width w, separated by ;. In a path a pad name is that pad's centre, name@x,y a point inside that pad or via, vN(x,y) a via of type N, cw(c..) or ccw(c..) an arc to the next point about the centre after c; other vN are vias at no path point)
GND: C7.2 C8.2 C9.2 C10.1 C11.1 C12.2 C13.2 C14.1 C15.1 C16.2 C17.2 C21.1 C22.1 C28.2 C29.2 C30.2 C32.1 C33.2 C34.2 C35.2 C37.1 C38.2 D4.A J1.2 J1.3 L2.1 P1.1 P1.3 pad.2 pad.3 R17.1 R18.1 R28.1 R29.1 R31.2 R35.2 R36.2 R49.2 R54.2 R59.1 R60.1 R64.1 R66.1 R67.2 R68.2 R72.2 R73.1 U1.3 U1.5 U2.3 U2.5 U3.3 U3.5 U4.3 U4.5 U7.2 U7.8 U9.1 U9.15 U9.38 U9.39_1 U9.39_2 U9.39_3 U9.39_4 U9.39_5 U9.39_6 U9.39_7 U9.39_8 U9.39_9 U9.39_10 U9.39_11 U9.39_12 U9.39_13 U9.39_14 U9.39_15 U9.39_16 U9.39_17 U9.39_18 U9.39_19 U9.39_20 U9.39_21 U12.3 U14.1 U14.3 U15.1 X2.1 X6.2 X8.8 | length 192.8
  Top Layer w0.254: U9.15@19.264,14 v1(22,14) ; R60.1 21,13 21.934,13.934 v1@21.934,13.974 ; R59.1 v1(22,29.953) ; P1.3 32,135.55 R35.2 ; R35.2@32.013,133.905 33.108,135 R36.2 ; R54.2 v1(35,28) ; C28.2 v1(41,28) ; C32.1 v1(44,14) ; C32.1@42.285,14.562 44.392,16.669 44.392,16.987 44.405,17 46.184,17 46.261,16.923 47.923,16.923 48,17 ; U14.3 46.15,18 46.227,18.077 46.769,18.077 47.846,17 48,17 ; C29.2 49.112,25.888 v1(50,25) ; C30.2@52.888,17 48,17 ; v1(53.6,117.4) C15.1 R31.2@55.824,115.577 ; C13.2 C12.2 v1(66,111.5) ; R18.1@60.112,37.888 C8.2 v1(62,39) ; v1@61.694,117.4 62.059,117.035 U7.2 ; C12.2@66.056,109.832 C9.2@79.944,109.832 ; U7.8@69.359,118.353 v1@71.553,118.353 ; C11.1 v1(72,83) ; C10.1@70,93.112 v1(70,94.492) ; v1(73,125) C22.1 C21.1@75.112,131 ; v1(74.488,113.512) C14.1 ; R17.1@87.065,38.888 C7.2 ; C7.2 v1(89,41)
  Top Layer w0.5: v1@1,7.027 1.019,7.046 1.019,8.869 C33.2@1,8.888 ; v2@1,30.919 1.5,30.419 U9.38 ; C33.2 1.112,10.48 1.5,10.868 U9.1 ; v2(4,124) J1.2 13,124 v2(16,124) ; R67.2 v1(5,59) ; R72.2 5.339,65.708 5.339,64.688 v1@6,64.027 ; R49.2 v1(7.5,76) ; L2.1 9.994,118.159 11.835,120 v2(13,120) ; U9.39_13 U9.39_2 ; U9.39_14 U9.39_3 U9.39_2 ; U9.39_18 U9.39_5 ; U9.39_19 U9.39_6 U9.39_5 ; U9.39_9 U9.39_7 U9.39_4 ; U15.1 v2(13.71,37.71) ; C37.1 20.55,99.4 21.4,100.25 v2(21.4,104) 21.376,104.024 19.024,104.024 R66.1 ; C34.2 v2(25,6) ; v3@26.85,71.85 R73.1@26.85,74.698 ; C35.2 v2(31,103) ; D4.A v2(35,122) ; R68.2 v1(39,47) ; C38.2 39.953,88.897 R64.1 v2(42,94) ; R29.1 v2(51,92) ; C17.2 C16.2 56.2,124.5 v1(60,128.3) ; v2(52,104) R28.1 ; U9.39_2 U9.39_1 U9.39_4 ; U9.39_4 U9.39_5
  other v1: 1,7 6,64 61.6,117.4 71.6,118.4
  other v2: 1,31
  other v3: 26.8,71.8
NetB1_1: B1.1 B1.7 B1.8 R61.1 | length 27.3
  Top Layer w0.5: B1.1 B1.8 B1.7 ; R61.1 38.4,118.4 38.4,107.469 B1.8@40.97,104.899
NetB1_2: B1.2 D4.C L1.2 | length 14.5
  Top Layer w0.5: L1.2@26.159,106 31,106 ; B1.2 31,104.3 31,106 ; D4.C 33.65,108.65 31,106
NetB1_3: B1.3 C35.1 | length 2
  Top Layer w0.5: C35.1 32.581,100 B1.3@32.851,99.73
NetB1_4: B1.4 C38.1 L1.1 pad.4@33,90 R63.2 X12.2 | length 26.6
  Top Layer w0.5: L1.1@27.994,101.841 29.91,99.925 29.91,99.386 32.106,97.19 B1.4 ; X12.2 37.835,86.54 40,84.375 C38.1 ; X12.2@33.024,86.564 33,86.588 33,89.976 33.024,90 R63.2@33.024,93.976 ; R63.2 B1.4@33.048,97.173
NetB1_5: B1.5 R63.1 R64.2 | length 7.3
  Top Layer w0.5: R63.1 R64.2 38.407,94.36 38.407,94.627 B1.5@40.844,97.064
NetB1_6: B1.6 B2.6 C16.1 C17.1 R61.2 R62.2 X1.2 | length 111.8
  Top Layer w0.5: v2(23,115) 23,113.76 B2.6 21.033,111.667 25.819,111.667 26.486,111 R62.2 ; v2(23,118) X1.2 24.6,124.4 ; R61.2 43,107 ; B1.6@41.049,99.809 43,101.76 43,107 ; C17.1 40.433,123.1 39.133,124.4 24.6,124.4 ; C16.1 60.675,123.1 57.487,119.912 45.512,119.912 43,117.4 ; 24.6,124.4 26.2,122.8 39.814,122.8 41.6,121.014 41.6,118.8 43,117.4 ; 43,107 43,117.4
  Bottom Layer w0.5: v2(23,115) v2(23,118)
NetB2_1: B2.1 B2.7 B2.8 R62.1 | length 18.2
  Top Layer w0.5: B2.1 B2.8 ; B2.7 B2.8 ; R62.1@27,120.869 22.941,116.81 B2.8
NetB2_2: B2.2 D5.C L2.2 | length 7.7
  Top Layer w0.5: D5.C L2.2 ; L2.2@8.429,114.27 B2.2
NetB2_3: B2.3 C36.1 | length 1.8
  Top Layer w0.5: C36.1@11.275,111.163 12.284,111.163 B2.3@12.851,111.73
NetB2_4: B2.4 C36.2 C37.2 D5.A R65.2 X10.2 | length 24.8
  Top Layer w0.5: X10.2 D5.A ; C36.2 11,107.64 12.64,106 R65.2 14,105.987 13.64,105.628 13.628,105.628 D5.A ; C36.2@11.039,109.151 B2.4@12.991,109.151 ; C37.2 10.074,99.4 9.474,100 D5.A
NetB2_5: B2.5 R65.1 R66.2 | length 7
  Top Layer w0.5: R65.1@15.929,105.976 R66.2@18.976,105.976 ; R66.2@19.013,105.953 20.92,107.86 B2.5@20.92,109.14
NetC1_1: C1.1 R3.1 U1.1 | length 7.4
  Top Layer w0.254: U1.1 89.101,47.38 C1.1@89.833,48.112 ; C1.1 R3.1@92.936,48.112
NetC1_2: C1.2 R2.2 U1.2 | length 16.5
  Top Layer w0.254: R2.2 79.74,44 U1.2 C1.2@89.968,49.92
NetC2_1: C2.1 R1.1 R3.2 R4.2 U2.2 | length 22.8
  Top Layer w0.254: U2.2 R1.1@90.635,66.73 ; R1.1@91.013,67.095 92.905,65.203 R4.2 ; R3.2@92.888,50.065 R4.2@92.888,63.983
NetC2_2: C2.2 C3.1 R4.1 R7.2 U2.1 | length 18.3
  Top Layer w0.254: C3.1 R7.2@82.888,60.936 ; R7.2 C2.2 R4.1@91.112,63.888 ; R7.2@82.953,61.013 85.172,63.232 85.172,63.702 U2.1
NetC3_2: C3.2 R5.2 R7.1 U1.6 | length 17
  Top Layer w0.254: U1.6 77.736,52.46 77.228,51.953 R5.2 74.013,51.953 77.108,55.048 77.108,55.369 79.739,58 C3.2 R7.1@81.112,60.936
NetC4_1: C4.1 R10.1 U3.1 | length 7.2
  Top Layer w0.254: U3.1 62.101,47.38 C4.1@62.833,48.112 ; C4.1 R10.1@65.935,48.112
NetC4_2: C4.2 R9.2 U3.2 | length 15.9
  Top Layer w0.254: R9.2 53,44 U3.2@58.475,49.475 ; U3.2 C4.2@62.968,49.92
NetC5_1: C5.1 R10.2 R11.2 R14.1 U4.2 | length 22.4
  Top Layer w0.254: U4.2 R14.1@63.683,66.73 ; R14.1@64.013,67.048 65.953,65.108 R11.2 ; R10.2@65.776,50.176 R11.2@65.776,63.823
NetC5_2: C5.2 C6.1 R11.1 R15.2 U4.1 | length 18.1
  Top Layer w0.254: C6.1 R15.2@55.776,60.776 ; R15.2 C5.2 R11.1@64,63.953 ; R15.2@56,61.013 58.342,63.355 58.342,63.702 U4.1
NetC6_2: C6.2 R12.2 R15.1 U3.6 | length 16.9
  Top Layer w0.254: R12.2 47.013,51.905 50.202,55.094 50.202,55.293 52.909,58 C6.2 R15.1@54,60.905 ; R12.2@47.006,51.899 50.345,51.899 50.906,52.46 U3.6
NetC7_1: C7.1 D1.C R17.2 U5.2 U5.5 | length 20.4
  Top Layer w0.254: U5.5 76.75,37.81 U5.2 85.73,32.73 D1.C R17.2 ; R17.2@87.065,37.112 C7.1
NetC8_1: C8.1 D2.C R18.2 U6.2 U6.5 | length 19.6
  Top Layer w0.254: U6.5 49.92,38.08 U6.2 59.65,33 D2.C R18.2 ; R18.2@60.017,36.112 C8.1
NetC9_1: C9.1 R19.1 R22.1 R23.1 R24.2 | length 19.9
  Top Layer w0.254: R24.2@73.965,107.952 R23.1 ; R23.1@77.048,108 R22.1@83.953,108 ; R22.1@84.048,108 v1(89,108) ; v1(92,108) R19.1
  Bottom Layer w0.254: v1(89,108) v1(92,108)
NetC10_2: C10.2 Q1.2 Q4.2 R23.2 | length 23.9
  Top Layer w0.254: C10.2 75,93 Q1.2 Q4.2 ; Q1.2@77.008,95.008 v1@77.008,99.992 ; v1@77.016,102.016 R23.2@77.016,106.032
  Bottom Layer w0.254: v1@77.016,100.016 v1@77.016,101.984
  other v1: 77.016,100 77.016,102
NetC11_2: C11.2 Q5.2 R25.2 | length 23.3
  Top Layer w0.254: C11.2@68,83.112 Q5.2 v1(68,95) ; v1(68,97) 69,98 R25.2
  Bottom Layer w0.254: v1(68,95) v1(68,97)
NetC12_1: C12.1 R24.1 R25.1 R26.1 R27.2 | length 11.8
  Top Layer w0.254: R27.2 R26.1@62.987,107.94 ; R26.1@63.16,108.112 R25.1@68.841,108.112 ; R25.1@69.013,107.94 R24.1
NetC13_1: C13.1 Q7.2 R27.1 R28.2 | length 24.9
  Top Layer w0.254: R28.2@52.16,108.112 C13.1@54.841,108.112 ; C13.1@55.319,108.112 R27.1@57.875,108.112 ; Q7.2@57.004,88.012 v1@57.004,97.988 ; v1@57.075,100 57.549,100.474 R27.1@57.549,107.444
  Bottom Layer w0.254: v1@57.017,98.001 v1@57.017,99.999
  other v1: 57.008,97.992 57.025,99.95
NetC14_2: C14.2 D3.2 D6.C IC.6 R19.2 R20.2 R21.2 R45.2 R47.2 R50.1 R71.1 U1.8 U2.8 U3.8 U4.8 U5.8 U6.8 U7.6 U10.8 U11.8 U12.8 U13.8 X1.1 | length 723.4
  Top Layer w0.254: IC.6 22.569,90.24 23.157,89.653 R47.2 ; U7.6 C14.2@72.347,115.765
  Top Layer w0.5: v2(1,64) 1,80 ; v2(1.9,93.1) 1,94 ; v1(2,79) 1,80 ; R71.1 v1(5,76) ; v2(5,94.7) 21.86,94.7 25.013,91.547 R47.2@25.013,89.653 ; D6.C 24,143 ; U13.8 29,66.78 v2(29,62) ; U12.8 26.16,56 v2(29,56) ; R45.2@25,82.7 26.372,82.7 26.665,82.993 26.665,88 R47.2@25.372,89.293 ; X1.1 26.64,127.1 46.729,127.1 46.919,127.29 54.273,127.29 59.483,132.5 v2(59.483,137.033) 57.906,138.61 U10.8 ; v2(36,56) 37,55 R50.1 ; D3.2 45.155,129.395 46.995,129.395 v2(47,129.4) ; U6.8 56.807,20.993 v2(60.972,20.993) ; U4.8 51.17,61.83 v2(52,61) ; 59.5,132.5 v2(73.6,118.4) ; v2(60.1,141.8) 59,142.9 59,143 ; v2(64,21) 76,21 ; v2@71.657,114.457 71.934,114.457 C14.2@72.712,115.235 ; U5.8 74.17,22.83 76,21 ; v2(78,61) U2.8 ; U11.8 95.953,117.027 ; R20.2 95.953,117.027 ; v2(97,124) 97,118.075 95.953,117.027 ; v2(101,59) 103,61 ; v2(101,124) 103,126 ; 1,80 1,94 ; 1,94 1,116.644 6.556,122.2 15.366,122.2 19.44,126.274 19.44,138.44 24,143 ; 24,143 59,143 ; 59,143 86.622,143 103,126.622 103,126 ; 76,21 86.397,21 101,35.603 v2(101,45) 103,47 103,61 ; 103,61 103,126
  Bottom Layer w0.5: v2(1,64) 3,62 v2(29,62) 29,58 ; v2(1.9,93.1) 3.5,94.7 v2(5,94.7) ; v1(2,79) v1(5,76) ; v2(29,56) 29,58 ; v2(36,56) 31,56 29,58 ; v2(47,127.29) v2(47,129.4) ; U3.8 53.843,44.707 81.707,44.707 82,45 ; v2(52,61) 53.6,59.4 79.6,59.4 ; v2(59.483,137.033) 59.483,141.102 60.1,141.719 v2(60.1,141.8) ; v2@61.003,20.997 v2@63.997,20.997 ; v2(71.6,114.4) 71.6,116.4 v2(73.6,118.4) ; U1.8 79.62,47.38 82,45 ; v2(78,61) 79.6,59.4 ; v2(97,124) v2(101,124) ; v2(101,45) 82,45 ; v2(101,59) 80,59 79.6,59.4
NetC15_2: C15.2 C24.2 D3.1 IC.11 R33.1 R46.1 U1.4 U2.4 U3.4 U4.4 U5.4 U6.4 U7.3 U10.4 U11.4 U12.4 U13.4 X10.1 | length 530.5
  Top Layer w0.254: R46.1@9.112,84.653 10.917,84.653 11.425,85.16 IC.11 ; R46.1@9.112,84.765 C24.2
  Top Layer w0.5: R33.1@4.688,49.735 4.688,48.688 4,48 ; v1(4.933,90.167) 3,92.1 ; X10.1 3,98.46 ; v2(6,48) 4,48 ; C24.2 v1(9.112,89.561) ; v2(10,63) 4,63 3,64 ; v2@11.006,48 11.816,47.19 U12.4 ; D3.1 43.25,128.917 43.211,128.878 42.738,128.878 41.95,128.09 ; U10.4 48.67,128.706 49.2,128.176 v2(49.2,128.095) 49.195,128.09 41.95,128.09 ; v2(57,42) 59,40 v2(81,40) ; C15.2 v2(59.6,117.4) 61.235,115.765 U7.3 ; v2(60,77) 98,77 100,79 ; v2(80,137) 78,139 78,141 ; v2@81,39.919 81.744,39.175 U5.4@81.744,37.896 ; v2(85,42) 88.75,42 100,53.25 100,58 ; U1.4 87.603,56.943 v2@87.943,56.943 ; v2(94,57) 99,57 100,58 ; 3,64 3,48.586 3.586,48 4,48 ; 3,64 3,92.1 ; 3,92.1 3,98.46 ; 3,98.46 3,117.725 6.825,121.55 15.635,121.55 20.09,126.005 20.09,128.09 ; 20.09,128.09 41.95,128.09 ; 20.09,128.09 20.09,135.505 25.584,141 60.431,141 78,141 ; 78,141 87.703,141 100,128.703 100,79 ; 100,58 100,79
  Bottom Layer w0.5: v1(4.933,90.167) 8.479,90.167 9.085,89.561 v1(9.112,89.561) ; v2(6,48) v2(11,48) ; v2@10.057,63.057 10.897,63.057 U13.4 ; v2(49.2,128.095) 59.543,117.752 v2@59.543,117.457 ; U6.4 55,40 v2(57,42) ; U3.4 60.83,57 v2(94,57) ; U4.4 58.83,75.83 v2(60,77) ; v2@80.057,136.943 80.057,132.963 U11.4 ; v2(81,40) 83,42 v2(85,42) ; U2.4 85.66,75.66 v2(87,77)
  other v2: 88,57
NetC18_1: C18.1 R34.2 R35.1 | length 7.2
  Top Layer w0.254: C18.1 R34.2
NetC18_2: C18.2 P1.2 | length 6.4
  Top Layer w0.254: C18.2@27,132.112 P1.2
NetC19_1: C19.1 C21.2 R38.1 U11.3 | length 14
  Top Layer w0.254: R38.1 C19.1 ; C21.2 R38.1@75,135.905 ; U11.3@82.788,132.888 C19.1@82.788,135.676
NetC19_2: C19.2 R39.2 U11.1 U11.2 | length 11.4
  Top Layer w0.254: U11.2@85.212,132.888 C19.2@85.212,135.676 ; U11.2 R39.2@93.925,132.83
NetC20_1: C20.1 C22.2 R40.1 U11.5 | length 25
  Top Layer w0.254: C22.2@77,124.723 79.723,122 C20.1 ; 80.19,122.078 U11.5 81.082,126.062 88.179,126.062 89.241,125 R40.1
NetC20_2: C20.2 C26.2 U11.6 U11.7 | length 9.9
  Top Layer w0.254: U11.6 U11.7 87.534,122.906 87.534,122.398 C26.2@87.932,122 ; C20.2 C26.2
NetC23_1: C23.1 Q8.1 R42.1 U12.2 | length 15.3
  Top Layer w0.254: v1(7,52) 7,52.694 9.767,55.46 Q8.1 ; v1@9.018,52.018 R42.1@10.935,52.018 ; R42.1@11.16,52.112 C23.1 ; C23.1@14.158,52.27 U12.2
  Bottom Layer w0.254: v1@7.009,52.009 v1@8.991,52.009
  other v1: 8.985,52.018
NetC23_2: C23.2 C31.1 pad.4@38,34.923 Q8.3 R44.1 R69.2 U12.1 | length 77.3
  Top Layer w0.254: R69.2 10.853,65.9 Q8.3 18.54,60.54 ; U12.1@17,54.84 v1(17,57) ; v1(17,59) 18.54,60.54 ; U12.1 15.087,54.81 14.165,53.888 10.039,53.888 8.408,52.257 8.408,49.635 13.125,44.918 33.04,44.918 38,39.957 C31.1 ; R44.1 19,61 18.54,60.54
  Bottom Layer w0.254: v1(17,57) v1(17,59)
NetC24_1: C24.1 IC.10 | length 3.1
  Top Layer w0.254: C24.1 IC.10
NetC25_1: C25.1 X3.2 | length 4.9
  Top Layer w0.254: C25.1@45.163,110.888 45.56,111.286 45.56,111.36 X3.2
NetC25_2: C25.2 pad.4@30.6,76.6 R73.2 R74.1 | length 51.6
  Top Layer w0.254: R73.2@26.852,76.6 30.6,76.6 40.9,76.6 45,80.7 C25.2 ; R73.2@26.852,76.7 R74.1
NetC26_1: C26.1 X5.2 | length 3.2
  Top Layer w0.254: X5.2 C26.1
NetC27_1: C27.1 X4.2 | length 3.9
  Top Layer w0.254: C27.1@53,76.112 X4.2
NetC27_2: C27.2 R1.2 R14.2 | length 48.1
  Top Layer w0.254: C27.2 59,76 ; R14.2 64,71 59,76 ; R1.2@90.987,69 83.987,76 59,76
NetC28_1: C28.1 R53.1 U14.6 | length 8.2
  Top Layer w0.254: R53.1 38.065,24.112 C28.1 40.921,24.033 U14.6@40.921,19.013
NetC29_1: C29.1 R52.1 U14.5 | length 8
  Top Layer w0.254: U14.5 R52.1 ; R52.1@45.065,24.112 C29.1
NetC30_1: C30.1 R51.1 U14.4 | length 10.5
  Top Layer w0.254: U14.4@45.013,18.513 C30.1@52.599,18.513 ; C30.1 R51.1@55.935,18.888
NetC31_2: C31.2 R53.2 | length 2.2
  Top Layer w0.254: R53.2 C31.2
NetC32_2: C32.2 C33.1 pad.4@27,37 R55.2 R56.2 R57.1 R58.1 U9.2 U9.23 U14.8 U15.2 X8.7 | length 144.7
  Top Layer w0.254: v1(31,18) U14.8
  Top Layer w0.5: C33.1@2.829,9.059 U9.2@2.829,11.359 ; C33.1 8.035,9 R57.1@10.987,6.048 ; R57.1@11.013,6.048 13.06,4 54.16,4 X8.7 ; U15.2@11.392,39.953 R58.1@17.952,39.953 ; R58.1 24.095,39.905 27,37 v2(27,35) ; U9.23 20.637,24.363 v2(22,23) ; v2@30.024,14.024 R56.2@32.024,14.024 ; R56.2@32.047,14.047 R55.2@34.976,14.047 ; R55.2@35,14.024 C32.2@40.088,14.024
  Bottom Layer w0.254: v2(30,14) 30,17 v1(31,18)
  Bottom Layer w0.5: v2(22,23) 26,23 27,24 ; v2(27,4) v2(27,13) ; v2(27,35) 27,24 ; v2(30,14) 29,13 v2(27,13) ; v2(27,13) 27,24
NetC34_1: C34.1 X7.1 | length 3.1
  Top Layer w0.254: X7.1 C34.1
NetD1_A: D1.A U5.1 | length 9
  Top Layer w0.254: U5.1 81.83,28.47 D1.A
NetD2_A: D2.A U6.1 | length 9.9
  Top Layer w0.254: U6.1 55,27.65 D2.A
NetD3_3: D3.3 R34.1 U10.3 | length 12.1
  Top Layer w0.254: R34.1 43.796,132 44.106,131.689 44.2,131.689 D3.3 ; D3.3@44.2,131.683 45.911,133.394 48.534,133.394 U10.3
NetD6_A: D6.A J1.A1 J1.B1 | length 13.3
  Top Layer w0.5: J1.A1@7.9,135.6 9.75,137.45 9.75,138.05 10.65,138.95 ; D6.A 10.65,138.95 ; J1.B1@14,135.6 10.65,138.95
NetIC_2: IC.2 R74.2 | length 3.2
  Top Layer w0.254: IC.2 R74.2@24.868,80.08
NetIC_4: IC.4 R45.1 | length 3.6
  Top Layer w0.254: IC.4 24.48,85.16 R45.1@24.987,84.652
NetIC_5: IC.5 R47.1 | length 3.4
  Top Layer w0.254: IC.5 R47.1@25,87.7
NetIC_8: IC.8 R48.1 U13.1 | length 27.6
  Top Layer w0.254: IC.8 11.515,92.78 8.101,89.366 8.101,82.023 10,80.124 R48.1 13.888,73.952 U13.1
NetIC_12: IC.12 R46.2 | length 4.9
  Top Layer w0.254: R46.2@9.128,82.62 IC.12
NetQ1_1: Q1.1 Q3.1 Q6.3 | length 22
  Top Layer w0.254: Q6.3 65.389,95.849 73.611,95.849 Q1.1 74.46,98.26 77.2,101 Q3.1
NetQ1_3: pad.4@58.3,80 Q1.3 Q2.3 R20.1 X4.1 | length 57.8
  Top Layer w0.254: X4.1 58.3,80 84.54,80 Q2.3 ; Q1.3 v1(82,95) ; v1(85,94) 85,83.54 Q2.3 ; R20.1 Q2.3
  Bottom Layer w0.254: v1(82,95) 84,95 v1(85,94)
NetQ2_1: Q2.1 Q4.1 Q5.3 | length 13.4
  Top Layer w0.254: Q5.3 Q4.1 80.46,82 Q2.1
NetQ2_2: Q2.2 Q3.2 R22.2 X5.1 | length 42.8
  Top Layer w0.254: Q2.2 Q3.2 ; R22.2 Q3.2 ; X5.1 90.54,107.54 Q3.2
NetQ3_3: Q3.3 Q4.3 R21.1 | length 27.1
  Top Layer w0.254: Q4.3 v1@81.999,88.001 ; v1@86,88.015 86.54,88.555 Q3.3 R21.1
  Bottom Layer w0.254: v1@82.018,87.982 v1@85.982,87.982
  other v1: 85.947,87.963 82.085,88.001
NetQ5_1: Q5.1 Q6.1 Q7.3 | length 12.8
  Top Layer w0.254: Q6.1@59.54,94.92 Q7.3 Q5.1
NetQ6_2: Q6.2 R26.2 X3.1 | length 41.7
  Top Layer w0.254: v1(47,99) 47,110.26 X3.1 ; v1(49,99) 58,99 Q6.2 62,105.06 R26.2@63,106.06
  Bottom Layer w0.254: v1(47,99) v1(49,99)
NetQ7_1: Q7.1 R29.2 | length 3.4
  Top Layer w0.254: R29.2@51.048,88 Q7.1
NetQ8_2: Q8.2 R41.2 | length 9.2
  Top Layer w0.254: Q8.2 R41.2
NetR2_1: R2.1 R5.1 R8.2 U1.7 | length 28.8
  Top Layer w0.254: R8.2 71,59.484 71.545,58.939 71.545,51.499 72.997,50.048 R5.1 R2.1 ; R5.1@74.128,49.92 U1.7
NetR6_1: R6.1 U2.7 U5.3 | length 45.8
  Top Layer w0.254: v1(70.968,58.7) 70.968,45.408 74.088,42.289 79.669,42.289 82.722,39.235 82.722,36.162 U5.3 ; v1(73.018,58.7) 75,60.682 R6.1 ; R6.1@75.318,66.73 U2.7
  Bottom Layer w0.254: v1(70.968,58.7) v1(73.018,58.7)
NetR6_2: R6.2 R8.1 U2.6 | length 6.7
  Top Layer w0.254: R8.1 R6.2 ; R6.2@75.318,69.27 U2.6
NetR9_1: R9.1 R12.1 R16.2 U3.7 | length 28.8
  Top Layer w0.254: R16.2 44,51.997 45.997,50 R12.1 ; R9.1@47,44.048 R12.1@47,49.92 ; R12.1@47.08,49.92 U3.7
NetR13_1: R13.1 U4.7 U6.3 | length 46.2
  Top Layer w0.254: v1(42.968,62) 42.968,46.456 47.004,42.42 51.922,42.42 55.892,38.449 55.892,36.432 U6.3 ; v1(45,62) 48,65 R13.1 ; R13.1@48.318,66.73 U4.7
  Bottom Layer w0.254: v1(42.968,62) v1(45,62)
NetR13_2: R13.2 R16.1 U4.6 | length 6.9
  Top Layer w0.254: R16.1 R13.2 ; R13.2@48.318,69.27 U4.6
NetR30_1: pad.4@48.4,83.9 R30.1 U7.5 X4.3 | length 51
  Top Layer w0.254: X4.3 48.4,82.06 48.4,83.877 48.423,83.9 48.4,83.923 48.4,105.976 53.114,110.69 57.808,110.69 59.505,112.387 R30.1 66.78,112.4 68.677,114.297 U7.5@69.114,114.297
NetR30_2: R30.2 R31.1 U7.4 | length 9.7
  Top Layer w0.254: R31.1 60.191,115.4 61.096,114.495 U7.4 ; R30.2 R31.1@57.6,115.353
NetR32_1: R32.1 X11.1 | length 4.3
  Top Layer w0.254: R32.1 44.352,136.892 X11.1
NetR32_2: R32.2 R36.1 U10.2 | length 12.2
  Top Layer w0.254: R36.1 R32.2@40.987,135 ; R32.2@41.013,134.987 42.202,133.798 46.398,133.798 U10.2
NetR33_2: R33.2 R42.2 R67.1 | length 9.9
  Top Layer w0.254: R33.2@5.013,51.952 v1@6.965,50 ; v1(9,50) R42.2@10.953,50
  Top Layer w0.5: R33.2 R67.1
  Bottom Layer w0.254: v1(7,50) v1(9,50)
NetR37_1: R37.1 R38.2 | length 4
  Top Layer w0.254: R37.1 R38.2
NetR37_2: R37.2 U10.1 X11.2 | length 25.2
  Top Layer w0.254: X11.2 45.06,135 U10.1 48.67,139.47 48.819,139.619 63.381,139.619 R37.2@66.528,136.472
NetR39_1: R39.1 R40.2 | length 4.1
  Top Layer w0.254: R40.2 R39.1
NetR41_1: R41.1 R43.1 U12.7 | length 18
  Top Layer w0.254: R41.1 27.957,58 30,55.957 R43.1 29.73,52.27 U12.7
NetR43_2: R43.2 R44.2 U12.5 | length 24.2
  Top Layer w0.254: R44.2 25.529,61 31.149,55.38 31.149,50.149 31,50 30.082,50 29.987,50.095 27.082,47.19 U12.5
NetR48_2: R48.2 R49.1 U13.2 | length 6.9
  Top Layer w0.254: R49.1 13.253,72.047 U13.2
NetR50_2: R50.2 R68.1 U12.6 | length 15.5
  Top Layer w0.254: U12.6 26.27,49.73 v1(27,49) ; v1(35,49) 36.905,49 R68.1
  Top Layer w0.5: R68.1 R50.2
  Bottom Layer w0.254: v1(27,49) v1(35,49)
NetR51_2: pad.4@71.6,30.3 R51.2 U5.6 U5.7 | length 24.5
  Top Layer w0.254: R51.2 60.3,19 71.53,30.23 71.67,30.23 71.67,30.3 74.1,32.73 U5.7 U5.6
NetR52_2: pad.4@45,30.66 R52.2 U6.6 U6.7 | length 10.6
  Top Layer w0.254: R52.2 45,30.66 U6.7 U6.6
NetR54_1: R54.1 U14.7 | length 8.6
  Top Layer w0.254: R54.1 35,23.057 39.557,18.5 U14.7
NetR55_1: R55.1 U9.36 U14.10 | length 54.4
  Top Layer w0.254: U9.36 4.04,31.74 5.502,33.202 23.899,33.202 36,21.101 v1(36,19) ; v1(37.016,16) 35.06,16 36.06,17 U14.10
  Bottom Layer w0.254: v1(36,19) 37.016,17.984 v1(37.016,16)
NetR56_1: R56.1 U9.33 U14.9 | length 48.1
  Top Layer w0.254: U9.33 7.85,29.799 8.849,30.798 12.326,30.798 13.721,32.193 24.337,32.193 29.577,26.953 29.577,17.423 31,16 32.06,16 33.56,17.5 U14.9
NetR57_2: R57.2 U9.3 X7.2 | length 14.4
  Top Layer w0.254: U9.3 4.04,10.185 4.698,9.527 9.413,9.527 R57.2@10.987,7.953 ; R57.2 13.507,7.953 X7.2
NetR58_2: R58.2 U9.25 X2.2 | length 12.6
  Top Layer w0.254: U9.25@18,28.428 v1(18,30) ; v1(18,36) R58.2 X2.2
  Bottom Layer w0.254: v1(18,30) v1(18,36)
NetR59_2: R59.2 U9.24 | length 2.6
  Top Layer w0.254: U9.24 R59.2@21.585,25.633
NetR60_2: R60.2 U9.14 | length 4.7
  Top Layer w0.254: 18.01,10.418 18.01,10.141 19.151,9 20.851,9 21,9.149 R60.2
NetR69_1: R69.1 R70.1 U13.3 | length 6.4
  Top Layer w0.254: R70.1 13.253,67.953 U13.3
NetR70_2: R70.2 R71.2 R72.1 | length 7.8
  Top Layer w0.254: R72.1@5.013,67.953 6.918,66.048 R70.2@7.987,66.048
  Top Layer w0.5: R72.1 R71.2
NetU7_1: U7.1 X3.3 | length 15.9
  Top Layer w0.254: X3.3 50.522,118.862 62.893,118.862 U7.1@63.451,118.305
NetU7_7: pad.4@81.8,117.1 U7.7 X5.3 | length 16.2
  Top Layer w0.254: U7.7 69.344,117.068 81.768,117.068 pad.4@81.8,117.035 ; pad.4@81.8,117.1 81.85,117.05 85.41,117.05 X5.3
NetU9_10: U9.10 X8.1 | length 30
  Top Layer w0.254: 12.93,10.418 12.93,10.141 15.06,8.01 38.91,8.01 X8.1
NetU9_12: U9.12 X8.3 | length 32.7
  Top Layer w0.254: U9.12@15.793,11.095 15.793,10.523 17.902,8.414 43.586,8.414 X8.3
NetU9_26: U9.26 X8.4 | length 52.4
  Top Layer w0.254: U9.26 16.74,29.799 17.518,30.577 22.191,30.577 24.596,28.172 24.596,13.875 28.807,9.664 44.876,9.664 X8.4@48.754,5.786
NetU9_29: U9.29 X8.2 | length 56
  Top Layer w0.254: U9.29 12.93,28.968 13.473,29.511 13.473,29.532 14.922,30.981 23.835,30.981 28,26.816 v1(28,12) ; v1(28.495,4.7) 42.16,4.7 X8.2
  Bottom Layer w0.254: v1(28,12) 28,5.289 28.495,4.794 v1(28.495,4.7)
NetU9_30: U9.30 X8.6 | length 60.8
  Top Layer w0.254: U9.30@11.983,28.741 11.983,29.291 12.203,29.511 12.203,29.532 14.056,31.385 24.002,31.385 28.404,26.983 28.404,14.639 32.571,10.472 49.148,10.472 X8.6
NetU9_31: U9.31 U14.2 | length 48.9
  Top Layer w0.254: U9.31@10.713,28.741 10.713,29.291 10.933,29.511 10.933,29.532 11.795,30.394 12.493,30.394 13.888,31.789 24.17,31.789 29,26.959 v1(29,20) ; U14.2 v1(46.5,17.5)
  Bottom Layer w0.254: v1(29,20) 44,20 v1(46.5,17.5)
NetU9_34: U9.34 X9.1 | length 4.4
  Top Layer w0.254: U9.34 6.58,30.04 X9.1
NetU9_35: U9.35 X9.2 | length 3.9
  Top Layer w0.254: U9.35 5.31,30.878 6,31.568 X9.2
NetU9_37: U9.37 X8.5 | length 76.4
  Top Layer w0.254: U9.37@3.093,28.741 3.093,31.364 6.729,35 v1(25,35) ; v1(25,29) 25,14.043 28.975,10.068 47.012,10.068 X8.5
  Bottom Layer w0.254: v1(25,29) v1(25,35)
NetU15_3: pad.4@33,71.7 U15.3 X6.1 X12.1 | length 62.6
  Top Layer w0.5: U15.3 24.17,42.29 X6.1 26.46,44 v2(33,44) ; v2(33,46) v2(33,75.2) ; v2(33,77.7) X12.1
  Bottom Layer w0.5: v2(33,44) v2(33,46) ; v2(33,75.2) v2(33,77.7)
pads on no net: IC.1 IC.3 IC.7 IC.9 IC.13 IC.14 J1.5 J1.6 U9.4 U9.5 U9.6 U9.7 U9.8 U9.9 U9.11 U9.13 U9.16 U9.17 U9.18 U9.19 U9.20 U9.21 U9.22 U9.27 U9.28 U9.32 U10.5 U10.6 U10.7 U13.5 U13.6 U13.7 U15.4

## Polygon pours and split planes (outlines as drawn)
GND on Bottom Layer "Ground_bottom" (solid, remove dead copper, pour order 0): 0,0 105,0 105,145 0,145

## Silkscreen, mask and mechanical layers (free items; w line width, h text height)
Top Overlay:
  drawing of 54 lines, arcs and shapes, not listed

## Text inside footprints (layer, text, board x,y; h text height)
L1: Top Overlay "*" at 26.635,99.428 h1.27 r90; Mechanical 13 "*" at 27.27,101.092 h1.27 r90
L2: Top Overlay "*" at 7.365,120.572 h1.27 r270; Mechanical 13 "*" at 6.73,118.908 h1.27 r270
U9: Mechanical 13 "ANTENNA" at -2.24,13.918 h1.78 r90
X1: Top Overlay "1" at 29.746,125.254 h1.52 r90; Top Overlay "2" at 20.746,124.254 h1.52 r90
X2: Top Overlay "1" at 24.746,34.254 h1.52 r90; Top Overlay "2" at 21.746,34.254 h1.52 r90
X3: Top Overlay "2" at 44.854,112.654 h1.52; Top Overlay "1" at 48.054,108.254 h1.52; Top Overlay "3" at 44.754,114.954 h1.52
X4: Top Overlay "2" at 54.746,82.254 h1.52 r90; Top Overlay "1" at 57.746,82.254 h1.52 r90; Top Overlay "3" at 47.746,79.254 h1.52 r90
X5: Top Overlay "2" at 88.746,113.254 h1.52 r90; Top Overlay "1" at 91.746,113.254 h1.52 r90; Top Overlay "3" at 85.746,113.254 h1.52 r90
X6: Top Overlay "1" at 23.698,44.286 h1.52 r270; Top Overlay "2" at 26.254,45.746 h1.52 r270
X8: Top Overlay "8" at 58.254,9.746 h1.52 r270; Top Overlay "7" at 55.254,9.746 h1.52 r270; Top Overlay "5" at 50.254,9.746 h1.52 r270; Top Overlay "6" at 53.254,9.746 h1.52 r270; Top Overlay "4" at 48.254,11.746 h1.52 r270; Top Overlay "3" at 45.254,9.746 h1.52 r270; Top Overlay "1" at 40.158,8.286 h1.52 r270; Top Overlay "2" at 42.254,9.746 h1.52 r270
X9: Top Overlay "RX" at 10.794,31.254 h1.52; Top Overlay "TX" at 0.794,31.254 h1.52
X10: Top Overlay "1" at 1.254,99.254 h1.52; Top Overlay "2" at 1.254,102.254 h1.52
X11: Top Overlay "2" at 42.746,133.746 h1.52 r180; Top Overlay "1" at 42.746,137.746 h1.52 r180
X12: Top Overlay "2" at 30.054,84.954 h1.52; Top Overlay "1" at 30.254,82.854 h1.52